# EAGLE board Quad LED Driver Board (EAGLE 9.7.0)
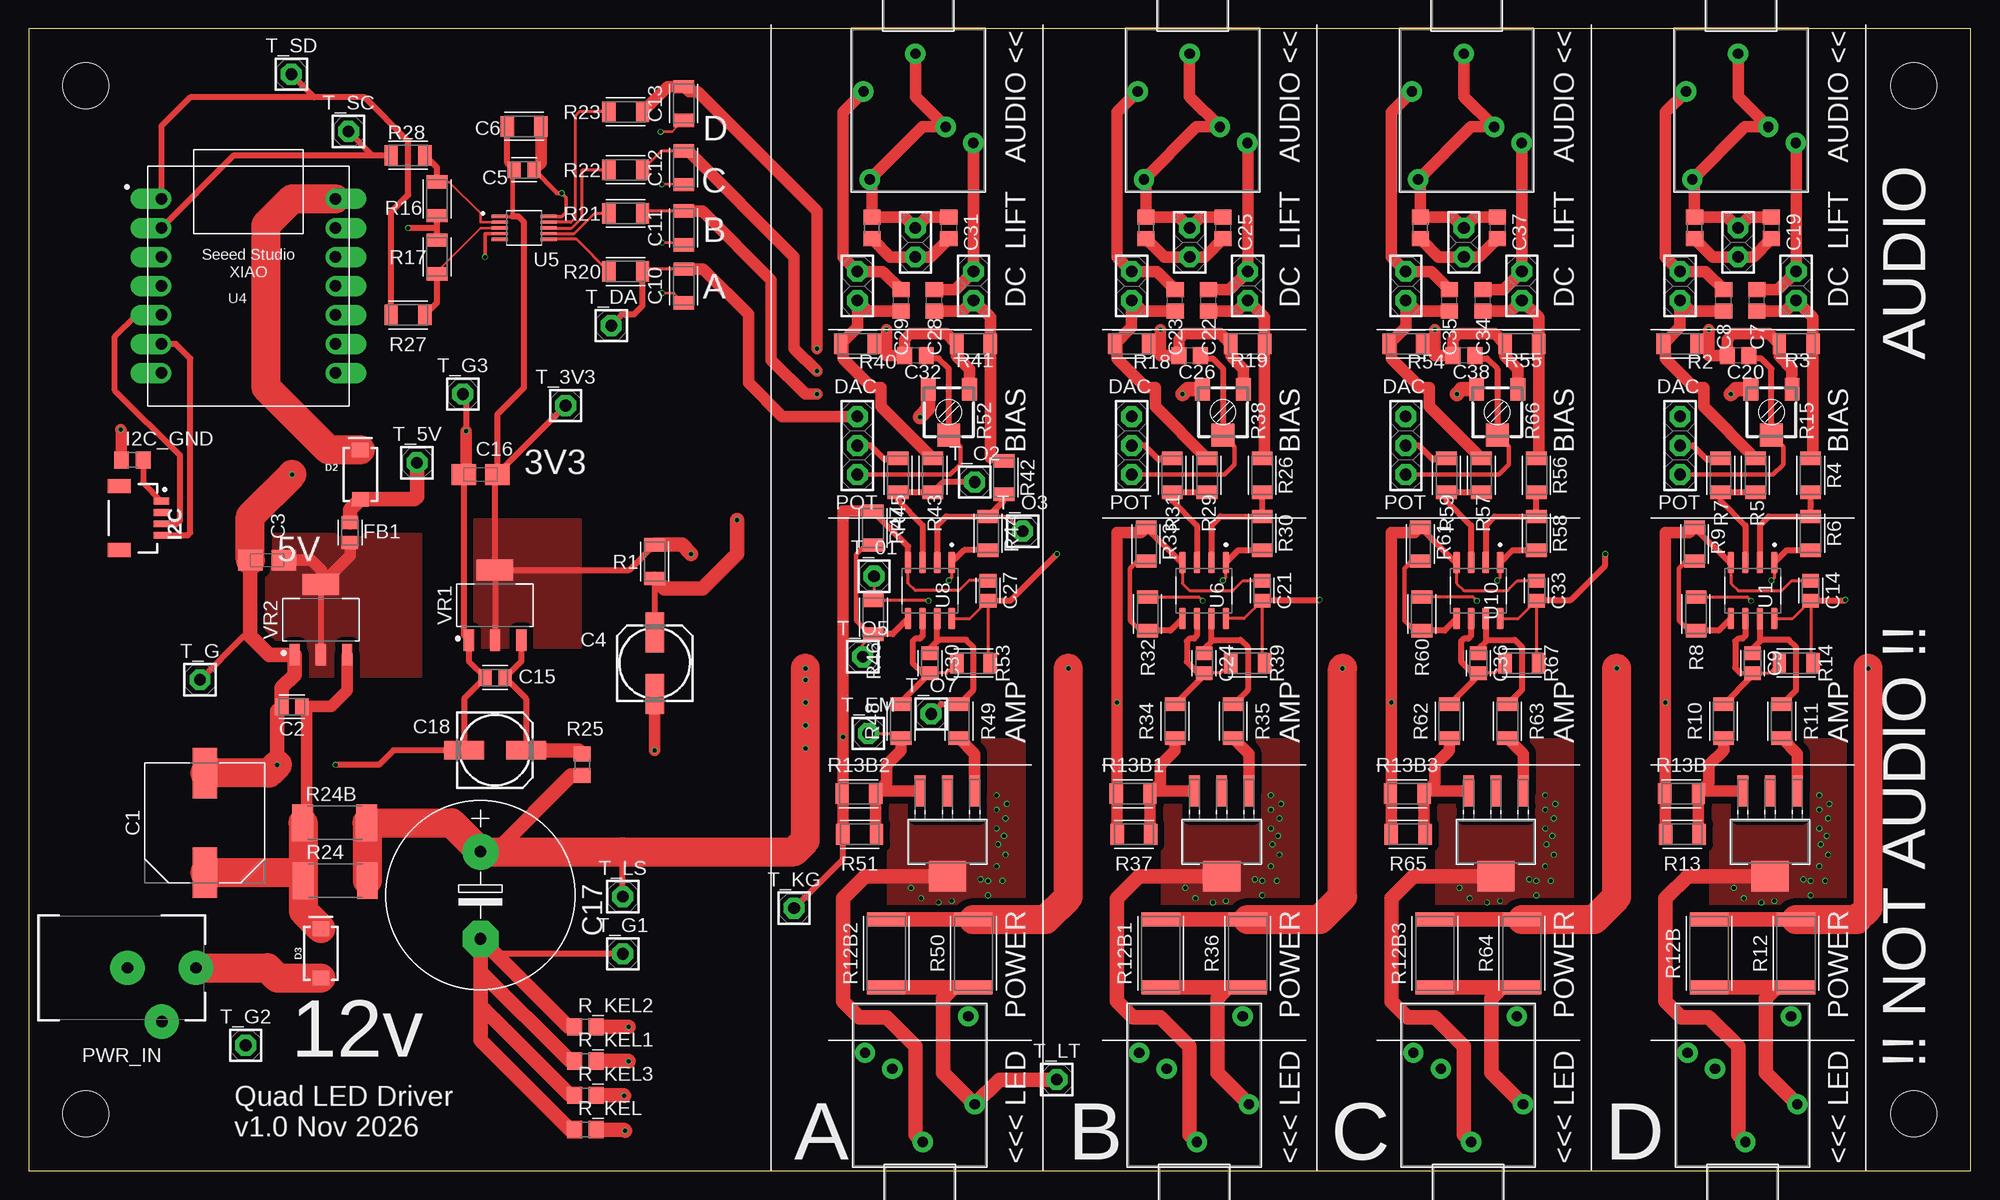
[diagram p0: board, top side]
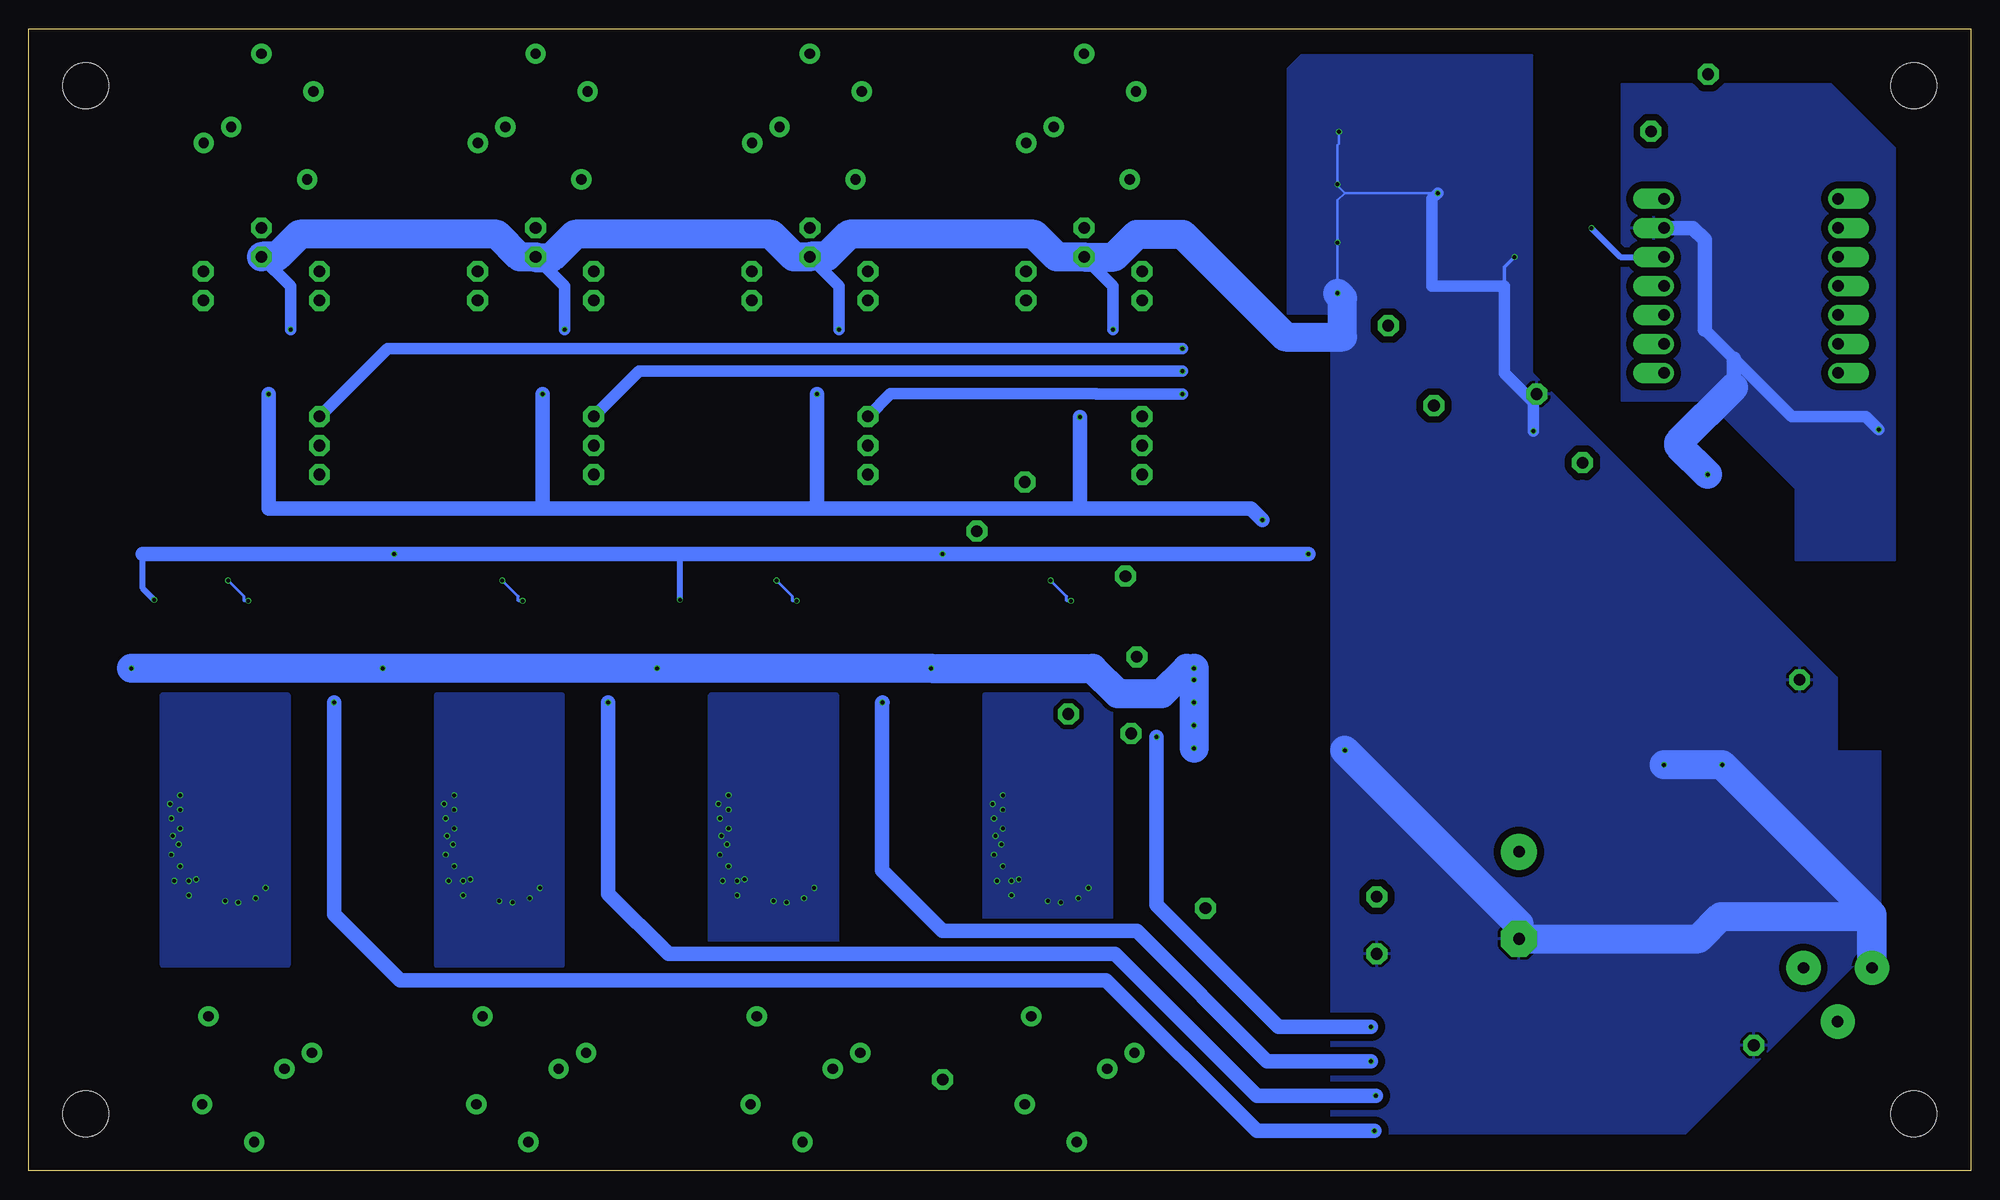
[diagram p1: board, bottom side, seen from below]

Size 170 x 100 mm. Coordinates in mm from the lower left corner, seen from the top.
Outline: 0,0 170,0 170,100 0,100 0,0
Copper layers (1*16): Top 0.035mm / dielectric 1.6mm / Bottom 0.035mm
Design rules "jlcpcb-2layers.dru": minimum track width 5mil, minimum drill 0.3mm, track to track 5mil, track to pad 5mil, pad to pad 5mil, via to via 5mil, smd to smd 5mil, copper to edge 0.9mm, drill to drill 6mil, minimum pad ring 10mil, minimum via ring 3mil, stop-mask expansion 4mil, vias tented up to drill 0mil, thermal gap 10mil
Holes 4 mm at 5,5 5,95 165,95 165,5

## Footprints (pad centres in the part's own frame; a part is rotated, then mirrored left to right if it is on the bottom)
1503_09_LMB = drill 0.9 pad 1.778 slot 1.7: 1 0,0; 4 -4,-11 | drill 0.9 pad 1.778 slot 1.7 rotated 90: 2 -4.55,-3.3; 3 5.05,-7.8; 5 2.65,-6.4
1X03 = drill 1.016 octagon: 1 -2.54,0; 2 0,0; 3 2.54,0
CAPAE1030X1050N = smd 4.416 x 2.115: 1 -4.353,0; 2 4.353,0
CAPC2012X110 = smd 1.165 x 1.465: 1 -0.875,0; 2 0.875,0
A/3216-18W = smd 2.15 x 1.8: + 1.475,0; - -1.475,0
153CLV-0605 = smd 3.5 x 1.6: + 2.7,0; - -2.7,0
CAPC3216X135 = smd 1.165 x 1.815: 1 -1.475,0; 2 1.475,0
C0805 = smd 1.3 x 1.5: 1 -0.95,0; 2 0.95,0
E7,5-16 = drill 1.016 pad 3.15: + -3.81,0 | drill 1.016 pad 3.15 octagon: - 3.81,0
SMA-DIODE = smd 1.27 x 1.47: A -2.15,0; C 2.15,0
BEADC2012X105N = smd 1.165 x 1.465: 1 -0.875,0; 2 0.875,0
JST04_1MM_RA = smd 0.6 x 1.35: 1 -1.5,0; 2 -0.5,0; 3 0.5,0; 4 1.5,0 | smd 1.2 x 2: NC1 2.8,-3.675; NC2 -2.8,-3.675
R0805 = smd 1.3 x 1.5: 1 -0.95,0; 2 0.95,0
1X02 = drill 1.016 octagon: 1 -1.27,0; 2 1.27,0
PJ-102AH = drill 1 pad 3 slot 1.6 rotated 90: 1 -6.5,0; 2 -0.5,0 | drill 1 pad 3 slot 1.6: 3 -3.5,4.7
RESC3216X70 = smd 1.165 x 1.815: 1 -1.475,0; 2 1.475,0
RESC6332X71 = smd 1.231 x 3.37: 1 -2.97,0; 2 2.97,0
RTRIM3314J = smd 1.3 x 2: 1 1.8,-2; 3 -1.8,-2 | smd 2 x 2: 2 0,2
R2512 = smd 1.8 x 3.2: 1 -2.8,0; 2 2.8,0
1X01 = drill 1.016 octagon: 1 0,0
SOIC127P600X175-8N = smd 1.9 x 0.6: 1 -2.455,1.905; 2 -2.455,0.635; 3 -2.455,-0.635; 4 -2.455,-1.905; 5 2.455,-1.905; 6 2.455,-0.635; 7 2.455,0.635; 8 2.455,1.905
SOT-223_3P7X6P7_ONS = smd 0.94 x 2.692: 1 -2.388,-4.458; 2 0,-4.458; 3 2.388,-4.458 | smd 3.251 x 2.692: 4 0,3.01
XIAO-GENERIC-HYBRID-MODULE14P-2.54-21X17.8MM = drill 1 pad 1.7 offset: 1 -7.62,7.62; 2 -7.62,5.08; 3 -7.62,2.54; 4 -7.62,0; 5 -7.62,-2.54; 6 -7.62,-5.08; 7 -7.62,-7.62; 8 7.62,-7.62; 9 7.62,-5.08; 10 7.62,-2.54; 11 7.62,0; 12 7.62,2.54; 13 7.62,5.08; 14 7.62,7.62
SOP50P490X110-10N = smd 1.47 x 0.28: 1 -2.15,1; 2 -2.15,0.5; 3 -2.15,0; 4 -2.15,-0.5; 5 -2.15,-1; 6 2.15,-1; 7 2.15,-0.5; 8 2.15,0; 9 2.15,0.5; 10 2.15,1
SOT230P700X170-4 = smd 1.86 x 0.898: 1 -3.075,2.3; 2 -3.075,0; 3 -3.075,-2.3 | smd 1.86 x 3.189: 4 3.075,0

## Placement (x,y rotation side)
AUDIO_IN  1503_091503_09_LMB  [1503_09_LMB]  149.62,97.79 0 top
AUDIO_IN1  1503_091503_09_LMB  [1503_09_LMB]  101.62,97.79 0 top
AUDIO_IN2  1503_091503_09_LMB  [1503_09_LMB]  77.62,97.79 0 top
AUDIO_IN3  1503_091503_09_LMB  [1503_09_LMB]  125.62,97.79 0 top
BIAS_SEL  PINHD-1X3  [1X03]  144.54,63.5 270 top
BIAS_SEL1  PINHD-1X3  [1X03]  96.54,63.5 270 top
BIAS_SEL2  PINHD-1X3  [1X03]  72.54,63.5 270 top
BIAS_SEL3  PINHD-1X3  [1X03]  120.54,63.5 270 top
C1  470uF  [CAPAE1030X1050N]  15.43,30.48 90 top
C2  330nF  [CAPC2012X110]  23.05,40.64 180 top
C3  10uF  [A/3216-18W]  20.89,53.47 0 top
C4  100uF  [153CLV-0605]  54.8,44.45 90 top
C5  100nF  [CAPC2012X110]  43.37,87.63 0 top
C6  10uF  [CAPC3216X135]  43.37,91.44 0 top
C7  1uF  [C0805]  151.27,76.2 90 top
C8  1uF  [C0805]  148.35,76.2 90 top
C9  1nF  [CAPC2012X110]  150.89,44.45 270 top
C10  10uF  [CAPC3216X135]  57.34,77.47 90 top
C11  10uF  [CAPC3216X135]  57.34,82.55 90 top
C12  10uF  [CAPC3216X135]  57.34,87.82 90 top
C13  10uF  [CAPC3216X135]  57.34,93.44 90 top
C14  100nF  [CAPC2012X110]  155.97,50.8 270 top
C15  100nF  [CAPC2012X110]  40.83,43.18 180 top
C16  10uF  [A/3216-18W]  39.56,60.96 0 top
C17  2200uF  [E7,5-16]  39.56,24.13 270 top
C18  100uF  [153CLV-0605]  40.83,36.83 0 top
C19  10nF DNF  [C0805]  152.54,82.55 270 top
C20  10uF  [C0805]  149.62,71.37 180 top
C21  100nF  [CAPC2012X110]  107.97,50.8 270 top
C22  1uF  [C0805]  103.27,76.2 90 top
C23  1uF  [C0805]  100.35,76.2 90 top
C24  1nF  [CAPC2012X110]  102.89,44.45 270 top
C25  10nF DNF  [C0805]  104.54,82.55 270 top
C26  10uF  [C0805]  101.62,71.37 180 top
C27  100nF  [CAPC2012X110]  83.97,50.8 270 top
C28  1uF  [C0805]  79.27,76.2 90 top
C29  1uF  [C0805]  76.35,76.2 90 top
C30  1nF  [CAPC2012X110]  78.89,44.45 270 top
C31  10nF DNF  [C0805]  80.54,82.55 270 top
C32  10uF  [C0805]  77.62,71.37 180 top
C33  100nF  [CAPC2012X110]  131.97,50.8 270 top
C34  1uF  [C0805]  127.27,76.2 90 top
C35  1uF  [C0805]  124.35,76.2 90 top
C36  1nF  [CAPC2012X110]  126.89,44.45 270 top
C37  10nF DNF  [C0805]  128.54,82.55 270 top
C38  10uF  [C0805]  125.62,71.37 180 top
D2  1A/40V/500mV  [SMA-DIODE]  29.05,60.96 90 top
D3  3A/40V/500mV  [SMA-DIODE]  25.59,19.05 90 top
FB1  600R @ 100MHz  [BEADC2012X105N]  28.13,55.88 90 top
I2C  QWIIC_RIGHT_ANGLE  [JST04_1MM_RA]  11.62,57.15 270 top
I2C_GND  0  [R0805]  9.08,62.23 0 top
J_DC_COLD  PINHD-1X2  [1X02]  144.54,77.47 90 top
J_DC_COLD1  PINHD-1X2  [1X02]  96.54,77.47 90 top
J_DC_COLD2  PINHD-1X2  [1X02]  72.54,77.47 90 top
J_DC_COLD3  PINHD-1X2  [1X02]  120.54,77.47 90 top
J_DC_HOT  PINHD-1X2  [1X02]  154.7,77.47 270 top
J_DC_HOT1  PINHD-1X2  [1X02]  106.7,77.47 270 top
J_DC_HOT2  PINHD-1X2  [1X02]  82.7,77.47 270 top
J_DC_HOT3  PINHD-1X2  [1X02]  130.7,77.47 270 top
J_LED  1503_091503_09_LMB  [1503_09_LMB]  150.25,2.54 180 top
J_LED1  1503_091503_09_LMB  [1503_09_LMB]  102.25,2.54 180 top
J_LED2  1503_091503_09_LMB  [1503_09_LMB]  78.25,2.54 180 top
J_LED3  1503_091503_09_LMB  [1503_09_LMB]  126.25,2.54 180 top
J_LIFT  PINHD-1X2  [1X02]  149.62,81.28 270 top
J_LIFT1  PINHD-1X2  [1X02]  101.62,81.28 270 top
J_LIFT2  PINHD-1X2  [1X02]  77.62,81.28 270 top
J_LIFT3  PINHD-1X2  [1X02]  125.62,81.28 270 top
PWR_IN  PJ-102AH  [PJ-102AH]  8.16,17.78 180 top
R1  100R  [RESC3216X70]  54.8,53.34 90 top
R2  1M  [RESC3216X70]  144.54,72.39 180 top
R3  1M  [RESC3216X70]  154.7,72.39 180 top
R4  100k  [RESC3216X70]  155.97,60.89 270 top
R5  100k  [RESC3216X70]  151.14,60.89 270 top
R6  100k  [RESC3216X70]  155.97,55.81 270 top
R7  100k  [RESC3216X70]  148.1,60.89 90 top
R8  10k  [RESC3216X70]  145.94,48.77 270 top
R9  1.6k  [RESC3216X70]  145.81,54.86 270 top
R10  1k  [RESC3216X70]  148.35,39.37 270 top
R11  220R  [RESC3216X70]  153.43,39.37 270 top
R12  47R  [RESC6332X71]  154.7,19.05 90 top
R12B  47R HPO  [RESC6332X71]  147.08,19.05 90 top
R12B1  47R HPO  [RESC6332X71]  99.08,19.05 90 top
R12B2  47R HPO  [RESC6332X71]  75.08,19.05 90 top
R12B3  47R HPO  [RESC6332X71]  123.08,19.05 90 top
R13  4.7R  [RESC3216X70]  144.74,29.46 0 top
R13B  4.7R HPO  [RESC3216X70]  144.67,33.02 0 top
R13B1  4.7R HPO  [RESC3216X70]  96.67,33.02 0 top
R13B2  4.7R HPO  [RESC3216X70]  72.67,33.02 0 top
R13B3  4.7R HPO  [RESC3216X70]  120.67,33.02 0 top
R14  470k  [RESC3216X70]  154.7,44.45 0 top
R15  10k  [RTRIM3314J]  152.54,66.42 180 top
R16  10k  [RESC3216X70]  35.75,85.09 90 top
R17  10k  [RESC3216X70]  35.75,80.01 90 top
R18  1M  [RESC3216X70]  96.54,72.39 180 top
R19  1M  [RESC3216X70]  106.7,72.39 180 top
R20  1k  [RESC3216X70]  52.26,78.74 180 top
R21  1k  [RESC3216X70]  52.26,83.82 180 top
R22  1k  [RESC3216X70]  52.26,87.63 180 top
R23  1k  [RESC3216X70]  52.26,92.71 180 top
R24  2.2  [R2512]  26.86,25.4 0 top
R24B  2.2  [R2512]  26.79,30.48 0 top
R25  22  [R0805]  48.45,35.56 90 top
R26  100k  [RESC3216X70]  107.97,60.89 270 top
R27  220  [RESC3216X70]  33.21,74.93 180 top
R28  220  [RESC3216X70]  33.21,88.9 180 top
R29  100k  [RESC3216X70]  103.14,60.89 270 top
R30  100k  [RESC3216X70]  107.97,55.81 270 top
R31  100k  [RESC3216X70]  100.1,60.89 90 top
R32  10k  [RESC3216X70]  97.94,48.77 270 top
R33  1.6k  [RESC3216X70]  97.81,54.86 270 top
R34  1k  [RESC3216X70]  100.35,39.37 270 top
R35  220R  [RESC3216X70]  105.43,39.37 270 top
R36  47R  [RESC6332X71]  106.7,19.05 90 top
R37  4.7R  [RESC3216X70]  96.74,29.46 0 top
R38  10k  [RTRIM3314J]  104.54,66.42 180 top
R39  470k  [RESC3216X70]  106.7,44.45 0 top
R40  1M  [RESC3216X70]  72.54,72.39 180 top
R41  1M  [RESC3216X70]  82.7,72.39 180 top
R42  100k  [RESC3216X70]  85.37,60.69 270 top
R43  100k  [RESC3216X70]  79.14,60.89 270 top
R44  100k  [RESC3216X70]  83.97,55.81 270 top
R45  100k  [RESC3216X70]  76.1,60.89 90 top
R46  10k  [RESC3216X70]  73.94,48.47 270 top
R47  1.6k  [RESC3216X70]  73.91,56.26 270 top
R48  1k  [RESC3216X70]  76.35,39.37 270 top
R49  220R  [RESC3216X70]  81.43,39.37 270 top
R50  47R  [RESC6332X71]  82.7,19.05 90 top
R51  4.7R  [RESC3216X70]  72.74,29.46 0 top
R52  10k  [RTRIM3314J]  80.54,66.42 180 top
R53  470k  [RESC3216X70]  82.7,44.45 0 top
R54  1M  [RESC3216X70]  120.54,72.39 180 top
R55  1M  [RESC3216X70]  130.7,72.39 180 top
R56  100k  [RESC3216X70]  131.97,60.89 270 top
R57  100k  [RESC3216X70]  127.14,60.89 270 top
R58  100k  [RESC3216X70]  131.97,55.81 270 top
R59  100k  [RESC3216X70]  124.1,60.89 90 top
R60  10k  [RESC3216X70]  121.94,48.77 270 top
R61  1.6k  [RESC3216X70]  121.81,54.86 270 top
R62  1k  [RESC3216X70]  124.35,39.37 270 top
R63  220R  [RESC3216X70]  129.43,39.37 270 top
R64  47R  [RESC6332X71]  130.7,19.05 90 top
R65  4.7R  [RESC3216X70]  120.74,29.46 0 top
R66  10k  [RTRIM3314J]  128.54,66.42 180 top
R67  470k  [RESC3216X70]  130.7,44.45 0 top
R_KEL  0  [R0805]  48.73,3.62 0 top
R_KEL1  0  [R0805]  48.73,9.62 0 top
R_KEL2  0  [R0805]  48.73,12.62 0 top
R_KEL3  0  [R0805]  48.73,6.62 0 top
R_LIFT  0  [R0805]  145.81,82.55 90 top
R_LIFT1  0  [R0805]  97.81,82.55 90 top
R_LIFT2  0  [R0805]  73.81,82.55 90 top
R_LIFT3  0  [R0805]  121.81,82.55 90 top
T_01  PINHD-1X1  [1X01]  74,52.06 0 top
T_3V3  PINHD-1X1  [1X01]  47,67 0 top
T_5V  PINHD-1X1  [1X01]  34,62 0 top
T_DA  PINHD-1X1  [1X01]  51,74 0 top
T_EM  PINHD-1X1  [1X01]  73.5,38.3 0 top
T_G  PINHD-1X1  [1X01]  15,43 0 top
T_G1  PINHD-1X1  [1X01]  52,19 0 top
T_G2  PINHD-1X1  [1X01]  19,11 0 top
T_G3  PINHD-1X1  [1X01]  38,68 0 top
T_KG  PINHD-1X1  [1X01]  67,23 0 top
T_LS  PINHD-1X1  [1X01]  52,24 0 top
T_LT  PINHD-1X1  [1X01]  90,8 0 top
T_O2  PINHD-1X1  [1X01]  82.8,60.3 0 top
T_O3  PINHD-1X1  [1X01]  87,56 0 top
T_O5  PINHD-1X1  [1X01]  73,45 0 top
T_O7  PINHD-1X1  [1X01]  79,40 0 top
T_SC  PINHD-1X1  [1X01]  28,91 0 top
T_SD  PINHD-1X1  [1X01]  23,96 0 top
U1  MCP6002-I/SN  [SOIC127P600X175-8N]  150.89,50.8 270 top
U2  BCP56-16  [SOT-223_3P7X6P7_ONS]  104.42,28.82 180 top
U3  BCP56-16  [SOT-223_3P7X6P7_ONS]  152.42,28.82 180 top
U4  XIAO-THRUHOLEHYBRID-SMT-THT  [XIAO-GENERIC-HYBRID-MODULE14P-2.54-21X17.8MM]  19.24,77.47 0 top
U5  MCP4728-E/UN  [SOP50P490X110-10N]  43.37,82.55 0 top
U6  MCP6002-I/SN  [SOIC127P600X175-8N]  102.89,50.8 270 top
U7  BCP56-16  [SOT-223_3P7X6P7_ONS]  80.42,28.82 180 top
U8  MCP6002-I/SN  [SOIC127P600X175-8N]  78.89,50.8 270 top
U9  BCP56-16  [SOT-223_3P7X6P7_ONS]  128.42,28.82 180 top
U10  MCP6002-I/SN  [SOIC127P600X175-8N]  126.89,50.8 270 top
VR1  LD1117_3v3  [SOT230P700X170-4]  40.83,49.53 90 top
VR2  LD1117_5V  [SOT230P700X170-4]  25.59,48.26 90 top

## Library data of the parts
AUDIO_IN AUDIO_IN1-AUDIO_IN3 J_LED J_LED1-J_LED3 = 3.5mm Jack; COPYRIGHT: Copyright (C) 2026 Ultra Librarian. All rights reserved.; MANUFACTURER_NAME: Lumberg; MANUFACTURER_PART_NUMBER: 1503 09
BIAS_SEL BIAS_SEL1-BIAS_SEL3 = Connector; CATEGORY_L1: Connectors; CATEGORY_L2: Headers; CATEGORY_L3: Male Pins; DESCRIPTION: Header-Straight-3 Position; PACKAGE: Through Hole; PITCH: 0.100" (2.54mm)
C1 = Capacitor; CATEGORY_L1: Capacitor; CATEGORY_L2: Aluminum Electrolytic Capacitors; CATEGORY_L3: Radial Can; PACKAGE: Surface Mount; PACKAGE_SIZE: 10.5MM
C2 C5 C9 C14 C15 C21 C24 C27 C30 C33 C36 = Capacitor; CATEGORY_L1: Capacitor; CATEGORY_L2: Ceramic Capacitors; CATEGORY_L3: MLCC; PACKAGE: Surface Mount; PACKAGE_SIZE: 0805
C3 C4 C7 C8 C16-C20 C22 C23 C25 C26 C28 C29 C31 C32 C34 C35 C37 C38 = rcl; SPICEPREFIX: C
C6 C10-C13 = Capacitor; CATEGORY_L1: Capacitor; CATEGORY_L2: Ceramic Capacitors; CATEGORY_L3: MLCC; PACKAGE: Surface Mount; PACKAGE_SIZE: 1206
D2 = SparkFun-DiscreteSemi; PROD_ID: DIO-08053
D3 = SparkFun-DiscreteSemi; PROD_ID: DIO-09886
FB1 = Filter; CATEGORY_L1: Ferrite Bead; DESCRIPTION: Generic Ferrite Bead 0805 (2012 Metric); PACKAGE: Surface Mount; PACKAGE_SIZE: 0805
I2C = SparkFun-Connectors; PROD_ID: CONN-13694
I2C_GND R24 R24B R25 R_KEL R_KEL1-R_KEL3 R_LIFT R_LIFT1-R_LIFT3 = rcl; SPICEPREFIX: R
J_DC_COLD J_DC_COLD1-J_DC_COLD3 J_DC_HOT J_DC_HOT1-J_DC_HOT3 J_LIFT J_LIFT1-J_LIFT3 = Connector; CATEGORY_L1: Connectors; CATEGORY_L2: Headers; CATEGORY_L3: Male Pins; DESCRIPTION: Header-Straight-2 Position; PACKAGE: Through Hole; PITCH: 0.100" (2.54mm)
PWR_IN = Connector; CATEGORY_L1: Connectors; CATEGORY_L2: Power Connectors; CATEGORY_L3: DC Jack Male; DATASHEET: https://www.sameskydevices.com/product/resource/pj-102ah.pdf; DESCRIPTION: Power Barrel Connector Jack 2.00mm ID (0.079") & 5.50mm OD (0.217") Through Hole & Right Angle; MANUFACTURER: Same Sky; MPN: PJ-102AH; OPERATING_TEMPERATURE: -25°C ~ 85°C; PACKAGE: Through Hole; PACKAGE_SIZE: NA; PART_STATUS: Active; PITCH: NA; ROHS: Compliant; SERIES: PJ-102
R1-R11 R13 R13B R13B1-R13B3 R14 R16-R23 R26-R35 R37 R39-R49 R51 R53-R63 R65 R67 = Resistor; CATEGORY_L1: Resistors; DESCRIPTION: Chip Resistor 3.20 X 1.60 X 0.70 mm body 1206(3216-METRIC) Package; PACKAGE: Surface Mount; PACKAGE_SIZE: 1206
R12 R12B R12B1-R12B3 R36 R50 R64 = Resistor; CATEGORY_L1: Resistors; DESCRIPTION: Chip Resistor 6.30 X 3.20 X 0.71 mm body 2512(6332-METRIC) Package; PACKAGE: Surface Mount; PACKAGE_SIZE: 2512
R15 R38 R52 R66 = rcl; SPICEMODEL: X; SPICEPREFIXL: POT
T_01 T_3V3 T_5V T_DA T_EM T_G T_G1-T_G3 T_KG T_LS T_LT T_O2 T_O3 T_O5 T_O7 T_SC T_SD = Connector; CATEGORY_L1: Connectors; CATEGORY_L2: Headers; CATEGORY_L3: Male Pins; DESCRIPTION: Header-Straight-1 Position; PACKAGE: Through Hole; PITCH: 0.100" (2.54mm)
U1 U6 U8 U10 = MCP6002-I_SN; AVAILABILITY: In Stock; CHECK_PRICES: https://www.snapeda.com/parts/MCP6002-I/SN/Microchip+Technology/view-part/?ref=eda; DESCRIPTION: Microchip , Dual Op Amp, 1MHzCMOS, Rail to Rail, 3V, 5V, 8-Pin SOIC | Microchip Technology Inc. MCP6002-I/SN; MF: Microchip Technology; MP: MCP6002-I/SN; PACKAGE: SO-8 Microchip; PRICE: None; PURCHASE-URL: https://www.snapeda.com/api/url_track_click_mouser/?unipart_id=6177737&manufacturer=Microchip Technology&part_name=MCP6002-I/SN&search_term=mcp6002-i/sn; SNAPEDA_LINK: https://www.snapeda.com/parts/MCP6002-I/SN/Microchip+Technology/view-part/?ref=snap
U2 U3 U7 U9 = BCP56; COPYRIGHT: Copyright (C) 2026 Ultra Librarian. All rights reserved.; MANUFACTURER_NAME: onsemi; MANUFACTURER_PART_NUMBER: BCP56-16T1G
U4 = Seeed Studio XIAO Series
U5 = MCP4728-E_UN; AVAILABILITY: In Stock; CHECK_PRICES: https://www.snapeda.com/parts/MCP4728-E/UN/Microchip+Technology/view-part/?ref=eda; DESCRIPTION: Microchip 4-channel 12 bit Serial DAC 10-Pin MSOP | Microchip Technology Inc. MCP4728-E/UN; MF: Microchip; MP: MCP4728-E/UN; PACKAGE: MSOP-10 Microchip; PRICE: None; PURCHASE-URL: https://www.snapeda.com/api/url_track_click_mouser/?unipart_id=43468&manufacturer=Microchip&part_name=MCP4728-E/UN&search_term=mcp4728; SNAPEDA_LINK: https://www.snapeda.com/parts/MCP4728-E/UN/Microchip+Technology/view-part/?ref=snap
VR1 VR2 = IC_Power-Management; CATEGORY_L1: Power Management IC; CATEGORY_L2: Voltage Regulator; CATEGORY_L3: Linear & LDO Regulators; DESCRIPTION: Linear Voltage Regulator IC SOT-223; PACKAGE: Surface Mount; PACKAGE_SIZE: SOT-223; SERIES: LM1117

## Nets
2: I2C.2
3V3_A: C5.1 C6.1 C14.2 C16.+ C21.2 C27.2 C33.2 R1.2 R14.2 R39.2 R53.2 R67.2 T_3V3.1 U1.8 U5.1 U6.8 U8.8 U10.8 VR1.2 VR1.4
3V3_BIAS: C4.+ R1.1 R15.1 R38.1 R52.1 R66.1
5V_RAW: C3.+ FB1.1 VR2.2 VR2.4
5V_XIAO: D2.A FB1.2 T_5V.1
12V_RAW: C1.1 C2.1 D3.C R24.1 R24B.1 VR2.3
+3V3_XIAO: R16.1 R17.2 U4.12
+12: D3.A PWR_IN.1
DAC_A: BIAS_SEL2.1 C10.2 R20.1 T_DA.1
DAC_B: BIAS_SEL1.1 C11.2 R21.1
DAC_C: BIAS_SEL3.1 C12.2 R22.1
DAC_D: BIAS_SEL.1 C13.2 R23.1
GND: C1.2 C2.2 C3.- C4.- C5.2 C6.2 C10.1 C11.1 C12.1 C13.1 C15.2 C16.- C17.- C18.- C19.2 C20.2 C25.2 C26.2 C31.2 C32.2 C37.2 C38.2 I2C_GND.1 J_LIFT1.2 J_LIFT2.2 J_LIFT3.2 J_LIFT.2 PWR_IN.2 R2.1 R3.2 R15.3 R18.1 R19.2 R38.3 R40.1 R41.2 R52.3 R54.1 R55.2 R66.3 R_KEL1.1 R_KEL2.1 R_KEL3.1 R_KEL.1 R_LIFT1.1 R_LIFT2.1 R_LIFT3.1 R_LIFT.1 T_G1.1 T_G2.1 T_G3.1 T_G.1 U4.13 U5.4 U5.10 VR1.1 VR2.1
K_GND_A: C27.1 R13B2.1 R47.1 R51.1 R_KEL2.2 T_KG.1 U8.4
K_GND_B: C21.1 R13B1.1 R33.1 R37.1 R_KEL1.2 U6.4
K_GND_C: C33.1 R13B3.1 R61.1 R65.1 R_KEL3.2 U10.4
K_GND_D: C14.1 R9.1 R13.1 R13B.1 R_KEL.2 U1.4
LED_SUPPLY: C17.+ R12.2 R12B1.2 R12B2.2 R12B3.2 R12B.2 R24.2 R24B.2 R25.1 R36.2 R50.2 R64.2 T_LS.1
N$1: D2.C U4.14
N$2: I2C.1 I2C_GND.2
N$3: C15.1 C18.+ R25.2 VR1.3
N$5: C8.1 J_DC_COLD.1 R2.2 R5.1
N$6: C7.1 J_DC_HOT.2 R3.1 R4.1
N$7: R4.2 R6.1 U1.2
N$8: R5.2 R7.1 U1.3
N$9: R6.2 R8.1 U1.1
N$10: R8.2 R9.2 U1.5
N$11: R11.2 U3.1
N$12: J_LED.2 R12.1 R12B.1
N$13: R10.2 R13.2 R13B.2 U3.3
N$14: C9.1 R11.1 U1.7
N$15: C9.2 R10.1 R14.1 U1.6
N$16: AUDIO_IN.2 C8.2 J_DC_COLD.2
N$17: BIAS_SEL.2 R7.2
N$18: AUDIO_IN.3 C7.2 J_DC_HOT.1
N$19: BIAS_SEL.3 C20.1 R15.2
N$20: J_LED.1 U3.4
N$21: C23.1 J_DC_COLD1.1 R18.2 R29.1
N$22: R16.2 R28.1 U5.2
N$23: R17.1 R27.1 U5.3
N$24: R20.2 U5.6
N$25: R21.2 U5.7
N$26: R22.2 U5.8
N$27: R23.2 U5.9
N$28: C22.1 J_DC_HOT1.2 R19.1 R26.1
N$29: R26.2 R30.1 U6.2
N$30: R29.2 R31.1 U6.3
N$31: R30.2 R32.1 U6.1
N$32: R32.2 R33.2 U6.5
N$33: R35.2 U2.1
N$34: J_LED1.2 R12B1.1 R36.1
N$35: R13B1.2 R34.2 R37.2 U2.3
N$36: C24.1 R35.1 U6.7
N$37: C24.2 R34.1 R39.1 U6.6
N$38: AUDIO_IN1.2 C23.2 J_DC_COLD1.2
N$39: BIAS_SEL1.2 R31.2
N$40: AUDIO_IN1.3 C22.2 J_DC_HOT1.1
N$41: BIAS_SEL1.3 C26.1 R38.2
N$42: J_LED1.1 U2.4
N$43: C29.1 J_DC_COLD2.1 R40.2 R43.1
N$44: C28.1 J_DC_HOT2.2 R41.1 R42.1
N$45: R42.2 R44.1 T_O3.1 U8.2
N$46: R43.2 R45.1 T_O2.1 U8.3
N$47: R44.2 R46.1 T_01.1 U8.1
N$48: R46.2 R47.2 T_O5.1 U8.5
N$49: R49.2 U7.1
N$50: J_LED2.2 R12B2.1 R50.1 T_LT.1
N$51: R13B2.2 R48.2 R51.2 T_EM.1 U7.3
N$52: C30.1 R49.1 T_O7.1 U8.7
N$53: C30.2 R48.1 R53.1 U8.6
N$54: AUDIO_IN2.2 C29.2 J_DC_COLD2.2
N$55: BIAS_SEL2.2 R45.2
N$56: AUDIO_IN2.3 C28.2 J_DC_HOT2.1
N$57: BIAS_SEL2.3 C32.1 R52.2
N$58: J_LED2.1 U7.4
N$59: C35.1 J_DC_COLD3.1 R54.2 R57.1
N$60: C34.1 J_DC_HOT3.2 R55.1 R56.1
N$61: R56.2 R58.1 U10.2
N$62: R57.2 R59.1 U10.3
N$63: R58.2 R60.1 U10.1
N$64: R60.2 R61.2 U10.5
N$65: R63.2 U9.1
N$66: J_LED3.2 R12B3.1 R64.1
N$67: R13B3.2 R62.2 R65.2 U9.3
N$68: C36.1 R63.1 U10.7
N$69: C36.2 R62.1 R67.1 U10.6
N$70: AUDIO_IN3.2 C35.2 J_DC_COLD3.2
N$71: BIAS_SEL3.2 R59.2
N$72: AUDIO_IN3.3 C34.2 J_DC_HOT3.1
N$73: BIAS_SEL3.3 C38.1 R66.2
N$74: J_LED3.1 U9.4
SCL_DAC: R28.2 T_SC.1 U4.2
SCL_NET: I2C.4 U4.6
SDA_DAC: R27.2 T_SD.1 U4.1
SDA_NET: I2C.3 U4.5
SLEEVE_A: AUDIO_IN2.1 AUDIO_IN2.4 AUDIO_IN2.5 C31.1 J_LIFT2.1 R_LIFT2.2
SLEEVE_B: AUDIO_IN1.1 AUDIO_IN1.4 AUDIO_IN1.5 C25.1 J_LIFT1.1 R_LIFT1.2
SLEEVE_C: AUDIO_IN3.1 AUDIO_IN3.4 AUDIO_IN3.5 C37.1 J_LIFT3.1 R_LIFT3.2
SLEEVE_D: AUDIO_IN.1 AUDIO_IN.4 AUDIO_IN.5 C19.1 J_LIFT.1 R_LIFT.2

## Tracks (layer width: path | path; a pad name or v marks a point on that pad's centre or on a via)
3V3_A  (via drill 0.35)
  Top 0.254: 42.35,87.49 C5.1 | U5.1 42.34,83.55 42.35,83.57 | U1.8 154.39,48.34 C14.2 155.97,44.66 R14.2 | U10.8 130.39,48.34 C33.2 131.97,44.66 R67.2 | U6.8 106.39,48.34 C21.2 107.97,44.66 R39.2 | U8.8 82.39,48.34 C27.2 83.97,44.66 R53.2
  Top 0.406: 42.35,83.57 42.35,87.49
  Top 0.508: C5.1 41.9,88.23 C6.1 | VR1.4 VR1.2 | VR1.4 40.83,60.76 C16.+ | R1.2 52.59,52.6 VR1.4 | C16.+ 41.03,66.25 43.37,68.58 43.37,83.06 42.88,83.55 42.34,83.55 | C27.2 85.92,49.92 v90,54 | C21.2 108.05,50 v113,50 | C33.2 132.04,50 135,50 138,53 v138,54 | C14.2 158.93,49.92 v159,50 | T_3V3.1 41.03,61.03 C16.+
  Top 1.27: R1.2 57.19,54.81 v58,54
  Bottom 0.508: v113,50 113,54 | v159,50 160,51 160,54
  Bottom 1.27: v58,54 v90,54 113,54 v138,54 160,54
  pour Top (isolate 0.61, no thermals): 37.1,45.8 48.37,45.8 48.37,57.07 37.1,57.07
3V3_BIAS  (via drill 0.35)
  Top 0.508: R1.1 C4.+
  Top 1.27: R1.1 55.66,51 59,51 62,54 v62,57 | R15.1 149.42,68.42 v149,68 | R66.1 125.42,68.42 v125,68 | R38.1 101.42,68.42 v101,68 | R52.1 78.74,66.74 v78,66
  Bottom 1.27: 125,58 149,58 v149,68 | 125,58 101,58 | 101,58 78,58 | 78,58 63,58 v62,57 | v125,68 125,58 | v101,68 101,58 | v78,66 78,58
5V_RAW
  Top 0.508: VR2.2 VR2.4
  Top 1.016: FB1.1 28.13,53.88 VR2.4 25.59,52.6 24.73,53.47 C3.+
  pour Top (isolate 0.61, no thermals): 20.59,43.26 34.4,43.26 34.4,55.8 20.59,55.8
5V_XIAO
  Top 1.27: FB1.2 28.13,57.89 D2.A 33.81,58.81 34,59 T_5V.1
12V_RAW
  Top 1.016: 24.06,30.41 24.32,30.67 24.32,40.24 C2.1 26.46,40.64 27.89,42.06 VR2.3
  Top 2.54: D3.C 24.06,22.73 R24.1 | R24.1 24.06,30.41 R24B.1 | C1.1 23.33,26.13 R24.1
+3V3_XIAO  (via drill 0.35)
  Top 0.508: R17.2 35.75,82.55 | 35.75,82.55 R16.1 | 35.75,82.55 v33.21,82.55
  Bottom 0.508: v33.21,82.55 30.67,80.01 U4.12
+12
  Top 2.54: PWR_IN.1 20.9,17.78 21.78,16.9 D3.A
DAC_A
  Top 0.254: R20.1 53.94,78.94 C10.2
  Top 0.508: T_DA.1 52,75 53,75 53.73,75.73 R20.1
  Top 1.016: C10.2 59.05,78.94 63,75 63,69 65.96,66.04 BIAS_SEL2.1
DAC_B  (via drill 0.35)
  Top 0.254: R21.1 53.94,84.03 C11.2
  Top 1.016: C11.2 58.98,84.03 65,78 65,71 68,68 v69,68
  Bottom 1.016: v69,68 76.53,68 76.57,68.04 94.54,68.04 BIAS_SEL1.1
DAC_C  (via drill 0.35)
  Top 0.254: R22.1 55.4,89.29 C12.2
  Top 1.016: C12.2 57.71,89.29 67,80 67,72 v69,70
  Bottom 1.016: BIAS_SEL3.1 116.58,70 v69,70
DAC_D  (via drill 0.35)
  Top 1.016: v69,72 69,84 58.54,94.46 57.8,94.46 C13.2 55.94,94.92 R23.1
  Bottom 1.016: BIAS_SEL.1 138.58,72 v69,72
GND  (via drill 0.35)
  Top 0.2: C13.1 57.34,91.95 56.34,90.95 v55.31,90.95 | v55.44,76.83 56.5,76.83 C10.1 | C11.1 57.13,81.28 v55.44,81.28 | C12.1 57.32,86.36 v55.44,86.36
  Top 0.305: U5.10 46.67,83.55 47.05,83.93 47.05,85.22 v46.67,85.6 | U5.4 39.94,82.04 v39.94,80.01
  Top 0.406: v46.67,85.6 46.28,85.6 C5.2
  Top 0.508: C16.- 38.09,46.9 VR1.1 38.53,44.6 C15.2 38.13,41.35 C18.- 31.94,36.83 30.67,35.56 v26.86,35.56 | T_G1.1 40.88,19 C17.- | T_G.1 18.81,46.81 19.42,46.81 | T_G3.1 38.29,67.71 v38.29,64.77
  Top 1.016: C6.2 44.84,88.23 C5.2 | C4.- v54.8,36.83 | v38.29,64.77 38.29,61.16 C16.- | I2C_GND.1 8.13,64.83 v8.06,64.9 | R2.1 147.08,72.39 | R_LIFT.1 147.4,80.01 J_LIFT.2 150.95,80.01 C19.2 | 147.08,72.39 147.08,71.37 C20.2 148.67,72.79 149.16,73.28 152.34,73.28 R3.2 153.22,71.33 154.34,70.21 R15.3 | 147.08,72.39 v147.08,73.66 | 123.08,72.39 R54.1 | R_LIFT3.1 123.4,80.01 J_LIFT3.2 126.95,80.01 C37.2 | 123.08,72.39 123.08,71.37 C38.2 124.67,72.79 125.16,73.28 128.34,73.28 R55.2 129.22,71.33 130.34,70.21 R66.3 | 123.08,72.39 v123.08,73.66 | 99.08,72.39 R18.1 | R_LIFT1.1 99.4,80.01 J_LIFT1.2 102.95,80.01 C25.2 | 99.08,72.39 99.08,71.37 C26.2 100.67,72.79 101.16,73.28 104.34,73.28 R19.2 105.22,71.33 106.34,70.21 R38.3 | 99.08,72.39 v99.08,73.66 | 75.08,72.39 R40.1 | R_LIFT2.1 75.4,80.01 J_LIFT2.2 78.95,80.01 C31.2 | 75.08,72.39 75.08,71.37 C32.2 76.67,72.79 77.16,73.28 80.34,73.28 R41.2 81.22,71.33 82.34,70.21 R52.3 | 75.08,72.39 v75.08,73.66
  Top 1.27: v21.78,35.56 21.78,40.24 C2.2 22.18,42.3 23.29,43.42 VR2.1 21.05,45.19 19.42,46.81 C3.- | R_KEL2.1 47.26,12.62 C17.- 39.56,17.44 | R_KEL1.1 47.38,9.62 39.56,17.44 | R_KEL3.1 47.38,6.62 39.56,14.44 | 39.56,14.44 39.56,17.44 | R_KEL.1 47.38,3.62 39.56,11.44 39.56,14.44
  Top 2.54: v21.78,35.56 21.05,34.83 C1.2 | C3.- 19.42,57.33 v23.05,60.96
  Bottom 0.2: v46.67,85.6 54.8,85.6 | 54.8,85.6 55.44,86.23 v55.44,86.36 55.44,89.79 55.31,89.92 v55.31,90.95 | 54.8,85.6 55.44,84.96 v55.44,81.28 v55.44,76.83
  Bottom 0.305: v39.94,80.01 40.83,79.12 40.83,77.47
  Bottom 1.016: v46.67,85.6 47.18,85.09 47.18,77.47 40.83,77.47 40.83,69.85 38.29,67.31 v38.29,64.77 | v8.06,64.9 9.21,66.04 15.68,66.04 20.76,71.12 23.3,73.66 | v147.08,73.66 147.08,77.47 J_LIFT.2 | v123.08,73.66 123.08,77.47 J_LIFT3.2 | v99.08,73.66 99.08,77.47 J_LIFT1.2 | v75.08,73.66 75.08,77.47 J_LIFT2.2
  Bottom 1.27: 20.76,71.12 20.76,68.58 | 23.3,73.66 23.3,81.53 24.32,82.55 U4.13
  Bottom 2.54: v54.8,36.83 39.56,21.59 C17.- 23.82,20.32 21.87,22.27 8.72,22.27 8.66,22.21 PWR_IN.2 8.66,22.44 v21.78,35.56 v26.86,35.56 | v23.05,60.96 25.59,63.5 25.59,63.75 20.76,68.58 | J_LIFT.2 149.56,80.07 148.22,80.07 146.28,82 129,82 127.01,80.01 J_LIFT3.2 125.52,79.91 124.27,79.91 122.18,82 105,82 103.01,80.01 J_LIFT1.2 101.56,80.07 100.11,80.07 98.18,82 82,82 80.01,80.01 J_LIFT2.2 74.99,80.01 73,82 69,82 60,73 55,73 55,76.4 v55.44,76.83
  pour Bottom (isolate 0.6): 6.62,53.42 15.35,53.42 15.35,59.71 15.37,59.73 23.01,67.37 23.03,67.39 30.59,67.39 30.59,95.17 12.28,95.17 6.62,89.51
  pour Bottom (isolate 0.61): 11.68,36.79 11.66,36.77 11.64,36.75 7.89,36.75 7.89,20.35 24.99,3.25 55.99,3.25 55.99,74.95 56.01,74.97 56.03,74.99 56.05,75.01 59.8,75.01 59.8,96.49 58.58,97.71 38.37,97.71 38.37,69.83 38.35,69.81 11.7,43.15 11.7,36.81
K_GND_A  (via drill 0.35)
  Top 0.254: C27.1 82.31,51.67 81.43,50.8 77.62,50.8 76.98,51.44 U8.4
  Top 0.508: U8.4 76.98,54.66 R47.1 | T_KG.1 71.27,27.27 R51.1
  Top 1.016: R51.1 71.27,32.94 R13B2.1 71.27,33.1 v71.27,38 71.27,57.78 73.87,57.78 R47.1
  Top 1.27: R_KEL2.2 52.48,12.62 v52.5,12.6
  Bottom 1.27: v71.27,38 71.27,23.27 60.6,12.6 v52.5,12.6
K_GND_B  (via drill 0.35)
  Top 0.254: C21.1 106.31,51.67 105.43,50.8 101.62,50.8 100.98,51.44 U6.4
  Top 0.508: R33.1 100.89,53.26 U6.4
  Top 1.016: R37.1 95.27,32.94 R13B1.1 95.27,33.1 v95.27,41 95.27,55.88 97.35,55.88 R33.1
  Top 1.27: R_KEL1.2 52.48,9.62 v52.5,9.6
  Bottom 1.27: v52.5,9.6 61.6,9.6 73,21 90,21 95.3,26.3 95.3,40.97 v95.27,41
K_GND_C  (via drill 0.35)
  Top 0.254: C33.1 130.31,51.67 129.43,50.8 125.62,50.8 124.98,51.44 U10.4
  Top 0.508: R61.1 124.89,53.26 U10.4
  Top 1.016: R65.1 119.27,32.94 R13B3.1 119.27,33.1 v119.27,41 119.27,55.88 121.35,55.88 R61.1
  Top 1.27: R_KEL3.2 52.08,6.62 v52.1,6.6
  Bottom 1.27: v52.1,6.6 62.5,6.6 74.9,19 114,19 119.27,24.27 v119.27,41
K_GND_D  (via drill 0.35)
  Top 0.254: C14.1 154.31,51.67 153.43,50.8 149.62,50.8 148.99,51.44 U1.4
  Top 0.508: R9.1 148.89,53.26 U1.4
  Top 1.016: R13.1 143.27,32.94 R13B.1 143.27,33.1 v143.27,41 143.27,55.88 145.35,55.88 R9.1
  Top 1.27: R_KEL.2 52.08,3.62 v52.2,3.5
  Bottom 1.27: v52.2,3.5 62.5,3.5 75.7,16.7 137.5,16.7 143.27,22.47 v143.27,41
LED_SUPPLY  (via drill 0.35)
  Top 0.508: T_LS.1 52,27.94
  Top 1.27: C17.+ 40.83,27.94 47.5,34.61 R25.1 | R12.2 R12B.2 | R64.2 R12B3.2 | R12B1.2 R36.2 | R50.2 R12B2.2
  Top 2.54: R24.2 29.66,30.41 R24B.2 37.02,30.48 C17.+ 52,27.94 67,27.94 68,28.94 v68,37 v68,39 v68,41 v68,43 v68,44 | R50.2 89.02,22.02 91,24 v91,44 | R36.2 113.02,22.02 115,24 v115,44 | R64.2 137.02,22.02 139,24 v139,44 | R12.2 160.02,22.02 161,23 v161,44
  Bottom 2.54: v161,44 v139,44 v115,44 v91,44 76.87,44 74.66,41.79 70.84,41.79 68.63,44 v68,44 v68,43 v68,41 v68,39 v68,37
N$1
  Top 2.54: U4.14 23.05,85.09 20.78,82.82 20.78,68.58 26.25,63.11 D2.C
N$2
  Top 0.508: I2C.1 10.03,60.24 I2C_GND.2
N$3
  Top 0.508: VR1.3 43.13,44.6 C15.1 43.53,41.35 C18.+
  Top 1.27: R25.2 48.13,36.83 C18.+
N$5
  Top 1.016: C8.1 145.49,75.25 J_DC_COLD.1 144.54,73.86 R2.2 143.27,72.19 143.27,71.12 145.81,68.58 146.62,68.58 146.62,66.89 R5.1
N$6
  Top 0.508: 156.1,62.5 R4.1
  Top 1.016: C7.1 153.75,75.25 J_DC_HOT.2 156.18,74.72 R3.1 156.18,62.58 156.1,62.5
N$7
  Top 0.508: U1.2 151.53,56.52 152.3,57.29 R6.1 R4.2
N$8
  Top 0.508: U1.3 150.25,56.52 148.1,58.67 R7.1 R5.2
N$9  (via drill 0.35)
  Top 0.254: U1.1 152.79,51.94 v152.54,51.69 | R8.1 150.43,50.24 v150.76,49.91
  Top 0.508: U1.1 153.88,54.34 R6.2
  Bottom 0.254: v152.54,51.69 151.14,50.29 151.14,49.91 v150.76,49.91
N$10
  Top 0.406: R8.2 145.3,47.29 144.41,48.18 144.41,52.75 145.05,53.39 R9.2
  Top 0.508: U1.5 147.93,47.29 R8.2
N$11
  Top 1.016: R11.2 154.81,36.52 U3.1
N$12
  Top 1.27: R12B.1 R12.1 153,16.08 152.03,15.11 152.03,8.61 J_LED.2
N$13
  Top 1.016: R10.2 148.35,36.83 147.08,35.56 147.08,33.96 R13B.2 | R13B.2 146.4,33.27 U3.3 | R13.2 146.14,29.54 R13B.2
N$14
  Top 0.508: U1.7 151.53,46.35 | 151.53,46.35 150.89,45.72 C9.1 | R11.1 154.7,42.12 154.7,45.85 154.06,46.48 151.65,46.48 151.53,46.35
N$15
  Top 0.254: R14.1 152.35,43.58 C9.2 | C9.2 149.82,43.58 | C9.2 150.89,43.38
  Top 0.508: 150.89,43.38 150.75,43.25 R10.1 | U1.6 150.25,46.86 150,46.61 149.62,46.61 149.37,46.35 149.37,44.03 149.82,43.58
N$16
  Top 1.016: C8.2 146.76,78.74 J_DC_COLD.2 143.27,80.01 143.27,92.69 AUDIO_IN.2
N$17
  Top 0.508: BIAS_SEL.2 145.67,63.5 146.94,62.23 147.08,62.37 R7.2
N$18
  Top 1.016: AUDIO_IN.3 154.7,89.96 J_DC_HOT.1 153.11,77.15 C7.2
N$19
  Top 0.406: BIAS_SEL.3 152.67,60.96 153.56,61.85 153.56,63.41 R15.2
  Top 0.508: C20.1 150.82,71.12 151.65,71.12 152.54,70.23 R15.2
N$20  (via drill 0.35)
  Top 1.27: J_LED.1 149.62,3.17 149.62,10.92 147.08,13.46 144.67,13.46 143.27,14.86 143.27,23.88 145.2,25.81 U3.4
  other vias: 149.24,24.78 155.34,25.53 156.73,31.62 155.97,24.13 155.97,25.4 157.24,25.4 156.73,26.67 157.49,27.69 156.86,28.57 157.37,29.34 156.73,29.97 157.49,30.86 157.62,32.13 156.73,32.89 150.13,23.88 151.65,23.5 152.79,23.62
  pour Top (isolate 0.61, no thermals): 147.33,23.11 159.02,23.11 159.02,37.59 148.2,37.59 147.33,36.72
  pour Bottom (isolate 0.406, no thermals): 147.33,18.03 158.26,18.03 158.26,41.66 147.33,41.66
N$21
  Top 1.016: C23.1 97.49,75.25 J_DC_COLD1.1 96.54,73.86 R18.2 95.27,72.19 95.27,71.12 97.81,68.58 98.62,68.58 98.62,66.89 R29.1
N$22
  Top 0.2: U5.2 39.56,83.05 39.56,83.82 36.81,86.56 R16.2
  Top 0.508: R28.1 35.75,87.83 R16.2
N$23
  Top 0.2: U5.3 39.56,82.55 35.75,78.74 R17.1
  Top 0.508: R17.1 35.75,76 R27.1
N$24
  Top 0.254: U5.6 47.98,81.55 R20.2
N$25
  Top 0.254: R21.2 49.53,83.82 47.76,82.05 U5.7
N$26
  Top 0.254: R22.2 48.45,87.63 48.45,83.45 47.55,82.55 U5.8
N$27
  Top 0.254: R23.2 48.2,92.71 47.81,92.33 47.81,83.39 47.47,83.05 U5.9
N$28
  Top 0.508: 108.1,62.5 R26.1
  Top 1.016: C22.1 105.75,75.25 J_DC_HOT1.2 108.17,74.72 R19.1 108.17,62.58 108.1,62.5
N$29
  Top 0.508: U6.2 103.53,56.52 104.3,57.29 R30.1 R26.2
N$30
  Top 0.508: U6.3 102.25,56.52 100.1,58.67 R31.1 R29.2
N$31  (via drill 0.35)
  Top 0.254: U6.1 104.8,51.94 v104.54,51.69 | R32.1 102.43,50.24 v102.76,49.91
  Top 0.508: U6.1 105.88,54.34 R30.2
  Bottom 0.254: v104.54,51.69 103.14,50.29 103.14,49.91 v102.76,49.91
N$32
  Top 0.406: R32.2 97.3,47.29 96.41,48.18 96.41,52.75 97.05,53.39 R33.2
  Top 0.508: U6.5 99.93,47.29 R32.2
N$33
  Top 1.016: R35.2 106.81,36.52 U2.1
N$34
  Top 1.27: R12B1.1 R36.1 105,16.08 104.03,15.11 104.03,8.61 J_LED1.2
N$35
  Top 1.016: R34.2 100.35,36.83 99.08,35.56 99.08,33.96 R13B1.2 | R13B1.2 98.4,33.27 U2.3 | R37.2 98.14,29.54 R13B1.2
N$36
  Top 0.508: 103.53,46.35 U6.7 | 103.53,46.35 102.89,45.72 C24.1 | R35.1 106.7,42.12 106.7,45.85 106.06,46.48 103.65,46.48 103.53,46.35
N$37
  Top 0.254: R39.1 104.35,43.58 C24.2
  Top 0.508: R34.1 102.89,43.38 C24.2 102.37,43.58 101.37,44.58 101.37,46.35 101.62,46.61 102,46.61 102.25,46.86 U6.6
N$38
  Top 1.016: C23.2 98.76,78.74 J_DC_COLD1.2 95.27,80.01 95.27,92.69 AUDIO_IN1.2
N$39
  Top 0.508: BIAS_SEL1.2 97.67,63.5 98.94,62.23 99.08,62.37 R31.2
N$40
  Top 1.016: AUDIO_IN1.3 106.7,89.96 J_DC_HOT1.1 105.11,77.15 C22.2
N$41
  Top 0.406: BIAS_SEL1.3 104.67,60.96 105.56,61.85 105.56,63.41 R38.2
  Top 0.508: C26.1 102.82,71.12 103.65,71.12 104.54,70.23 R38.2
N$42  (via drill 0.35)
  Top 1.27: J_LED1.1 101.62,3.17 101.62,10.92 99.08,13.46 96.67,13.46 95.27,14.86 95.27,23.88 97.2,25.81 U2.4
  other vias: 101.24,24.78 107.33,25.53 108.73,31.62 107.97,24.13 107.97,25.4 109.24,25.4 108.73,26.67 109.49,27.69 108.86,28.57 109.37,29.34 108.73,29.97 109.49,30.86 109.62,32.13 108.73,32.89 102.13,23.88 103.65,23.5 104.8,23.62
  pour Top (isolate 0.61, no thermals): 99.33,23.11 111.02,23.11 111.02,37.59 100.2,37.59 99.33,36.72
  pour Bottom (isolate 0.406, no thermals): 99.33,18.03 110.26,18.03 110.26,41.66 99.33,41.66
N$43
  Top 1.016: C29.1 73.49,75.25 J_DC_COLD2.1 72.54,73.86 R40.2 71.27,72.19 71.27,71.12 73.81,68.58 74.62,68.58 74.62,66.89 R43.1
N$44
  Top 0.508: R42.1 85.14,62.4 84.17,62.4
  Top 1.016: C28.1 81.75,75.25 J_DC_HOT2.2 84.17,74.72 R41.1 84.17,62.4
N$45
  Top 0.254: T_O3.1 85.71,57.29 R44.1
  Top 0.508: U8.2 79.53,56.52 80.3,57.29 R44.1 85.37,58.69 R42.2
N$46
  Top 0.508: U8.3 78.25,56.52 76.1,58.67 R45.1 R43.2 80.02,60.3 T_O2.1
N$47  (via drill 0.35)
  Top 0.254: U8.1 80.8,51.94 v80.54,51.69 | v78.76,49.91 78.73,49.94 R46.1 74,50.01 T_01.1
  Top 0.508: U8.1 81.88,54.34 R44.2
  Bottom 0.254: v80.54,51.69 79.14,50.29 79.14,49.91 v78.76,49.91
N$48
  Top 0.254: T_O5.1 73,46.06 R46.2
  Top 0.406: R46.2 73.6,46.99 72.41,48.18 72.41,53.95 73.25,54.79 R47.2
  Top 0.508: U8.5 75.63,46.99 R46.2
N$49
  Top 1.016: R49.2 82.81,36.52 U7.1
N$50
  Top 1.27: R12B2.1 R50.1 81,16.08 80.03,15.11 80.03,8.61 J_LED2.2 84.97,8 T_LT.1
N$51
  Top 0.254: T_EM.1 75.94,38.3 R48.2
  Top 1.016: R48.2 76.35,36.83 75.08,35.56 75.08,33.96 R13B2.2 | R13B2.2 74.4,33.27 U7.3 | R51.2 74.14,29.54 R13B2.2
N$52
  Top 0.508: 79.53,46.35 U8.7 | 79.53,46.35 78.89,45.72 C30.1 | 79.53,46.35 79.65,46.48 82.06,46.48 82.7,45.85 82.7,42.12 R49.1 79.84,40.84 T_O7.1
N$53
  Top 0.254: R53.1 80.35,43.58 C30.2 | R48.1 76.35,41.03
  Top 0.508: U8.6 78.25,46.86 78,46.61 77.62,46.61 77.37,46.35 77.37,44.43 78.22,43.58 C30.2 76.35,41.03
N$54
  Top 1.016: C29.2 74.76,78.74 J_DC_COLD2.2 71.27,80.01 71.27,92.69 AUDIO_IN2.2
N$55
  Top 0.508: BIAS_SEL2.2 73.67,63.5 74.94,62.23 75.08,62.37 R45.2
N$56
  Top 1.016: AUDIO_IN2.3 82.7,89.96 J_DC_HOT2.1 81.11,77.15 C28.2
N$57
  Top 0.406: BIAS_SEL2.3 80.67,60.96 81.56,61.85 81.56,63.41 R52.2
  Top 0.508: C32.1 78.82,71.12 79.65,71.12 80.54,70.23 R52.2
N$58  (via drill 0.35)
  Top 1.27: J_LED2.1 77.62,3.17 77.62,10.92 75.08,13.46 72.67,13.46 71.27,14.86 71.27,23.88 73.2,25.81 U7.4
  other vias: 77.24,24.78 83.33,25.53 84.73,31.62 83.97,24.13 83.97,25.4 85.24,25.4 84.73,26.67 85.49,27.69 84.86,28.57 85.37,29.34 84.73,29.97 85.49,30.86 85.62,32.13 84.73,32.89 78.13,23.88 79.65,23.5 80.8,23.62
  pour Top (isolate 0.61, no thermals): 75.33,23.11 87.02,23.11 87.02,37.59 76.2,37.59 75.33,36.72
  pour Bottom (isolate 0.406, no thermals): 75.33,18.03 86.26,18.03 86.26,41.66 75.33,41.66
N$59
  Top 1.016: C35.1 121.49,75.25 J_DC_COLD3.1 120.54,73.86 R54.2 119.27,72.19 119.27,71.12 121.81,68.58 122.62,68.58 122.62,66.89 R57.1
N$60
  Top 0.508: 132.1,62.5 R56.1
  Top 1.016: C34.1 129.75,75.25 J_DC_HOT3.2 132.18,74.72 R55.1 132.18,62.58 132.1,62.5
N$61
  Top 0.508: U10.2 127.53,56.52 128.3,57.29 R58.1 R56.2
N$62
  Top 0.508: U10.3 126.25,56.52 124.1,58.67 R59.1 R57.2
N$63  (via drill 0.35)
  Top 0.254: U10.1 128.79,51.94 v128.54,51.69 | R60.1 126.43,50.24 v126.76,49.91
  Top 0.508: U10.1 129.88,54.34 R58.2
  Bottom 0.254: v128.54,51.69 127.14,50.29 127.14,49.91 v126.76,49.91
N$64
  Top 0.406: R60.2 121.3,47.29 120.41,48.18 120.41,52.75 121.05,53.39 R61.2
  Top 0.508: U10.5 123.93,47.29 R60.2
N$65
  Top 1.016: R63.2 130.81,36.52 U9.1
N$66
  Top 1.27: R12B3.1 R64.1 129,16.08 128.03,15.11 128.03,8.61 J_LED3.2
N$67
  Top 1.016: R62.2 124.35,36.83 123.08,35.56 123.08,33.96 R13B3.2 | R13B3.2 122.4,33.27 U9.3 | R65.2 122.14,29.54 R13B3.2
N$68
  Top 0.508: U10.7 127.53,46.35 | 127.53,46.35 126.89,45.72 C36.1 | R63.1 130.7,42.12 130.7,45.85 130.06,46.48 127.65,46.48 127.53,46.35
N$69
  Top 0.254: R67.1 128.35,43.58 C36.2
  Top 0.508: R62.1 126.89,43.38 C36.2 126.37,43.58 125.37,44.58 125.37,46.35 125.62,46.61 126,46.61 126.25,46.86 U10.6
N$70
  Top 1.016: C35.2 122.76,78.74 J_DC_COLD3.2 119.27,80.01 119.27,92.69 AUDIO_IN3.2
N$71
  Top 0.508: BIAS_SEL3.2 121.67,63.5 122.94,62.23 123.08,62.37 R59.2
N$72
  Top 1.016: AUDIO_IN3.3 130.7,89.96 J_DC_HOT3.1 129.11,77.15 C34.2
N$73
  Top 0.406: BIAS_SEL3.3 128.67,60.96 129.56,61.85 129.56,63.41 R66.2
  Top 0.508: C38.1 126.82,71.12 127.65,71.12 128.54,70.23 R66.2
N$74  (via drill 0.35)
  Top 1.27: J_LED3.1 125.62,3.17 125.62,10.92 123.08,13.46 120.67,13.46 119.27,14.86 119.27,23.88 121.2,25.81 U9.4
  other vias: 125.24,24.78 131.34,25.53 132.73,31.62 131.97,24.13 131.97,25.4 133.24,25.4 132.73,26.67 133.49,27.69 132.86,28.57 133.37,29.34 132.73,29.97 133.49,30.86 133.62,32.13 132.73,32.89 126.13,23.88 127.65,23.5 128.79,23.62
  pour Top (isolate 0.61, no thermals): 123.33,23.11 135.02,23.11 135.02,37.59 124.2,37.59 123.33,36.72
  pour Bottom (isolate 0.406, no thermals): 123.33,18.03 134.26,18.03 134.26,41.66 123.33,41.66
SCL_DAC
  Top 0.508: U4.2 17.97,88.9 30,88.9 | 30,88.9 R28.2 | T_SC.1 30,89 30,88.9
SCL_NET
  Top 0.508: I2C.4 13.93,55.65 14.16,55.88 14.16,71.12 12.89,72.39 U4.6
SDA_DAC
  Top 0.508: U4.1 11.62,91.44 14.16,93.98 25,93.98 | 25,93.98 29.4,93.98 33.23,90.15 33.23,85.46 31.73,83.96 R27.2 | T_SD.1 25,94 25,93.98
SDA_NET
  Top 0.508: I2C.3 13.03,56.65 13.27,56.9 13.27,62.61 7.56,68.33 7.56,73.03 9.46,74.93 U4.5
SLEEVE_A
  Top 1.016: AUDIO_IN2.1 77.62,94.04 AUDIO_IN2.5 78.22,91.39 AUDIO_IN2.4 73.81,86.6 R_LIFT2.2 76.67,83.5 J_LIFT2.1 78.57,83.5 C31.1
SLEEVE_B
  Top 1.016: AUDIO_IN1.1 101.62,94.04 AUDIO_IN1.5 102.22,91.39 AUDIO_IN1.4 97.81,86.6 R_LIFT1.2 100.67,83.5 J_LIFT1.1 102.57,83.5 C25.1
SLEEVE_C
  Top 1.016: AUDIO_IN3.1 125.62,94.04 AUDIO_IN3.5 126.22,91.39 AUDIO_IN3.4 121.81,86.6 R_LIFT3.2 124.67,83.5 J_LIFT3.1 126.57,83.5 C37.1
SLEEVE_D
  Top 1.016: AUDIO_IN.1 149.62,94.04 AUDIO_IN.5 150.22,91.39 AUDIO_IN.4 145.81,86.6 R_LIFT.2 148.67,83.5 J_LIFT.1 150.57,83.5 C19.1

## Text on the board
tPlace: D | AUDIO << | AUDIO << | AUDIO << | AUDIO << | C | B | LIFT | LIFT | LIFT | LIFT | A | DC | DC | DC | DC | AUDIO | DAC | DAC | DAC | DAC | BIAS | BIAS | BIAS | BIAS | 3V3 | POT | POT | POT | POT | 5V | AMP | AMP | AMP | AMP | POWER | POWER | POWER | POWER | 12v | !! NOT AUDIO !! | Quad LED Driver / v1.0 Nov 2026 | A | <<< LED | B | <<< LED | C | <<< LED | D | <<< LED